# Altium PCB PCB1.PcbDoc (part 3 of 4)
Units mm, origin at the board's own origin, x right, y up, seen from the top; angles counter-clockwise.
Board outline 200 x 135 mm, 2 copper layers (Top Layer, Bottom Layer); 350 components, 150 nets, 843 pads, 251 vias.
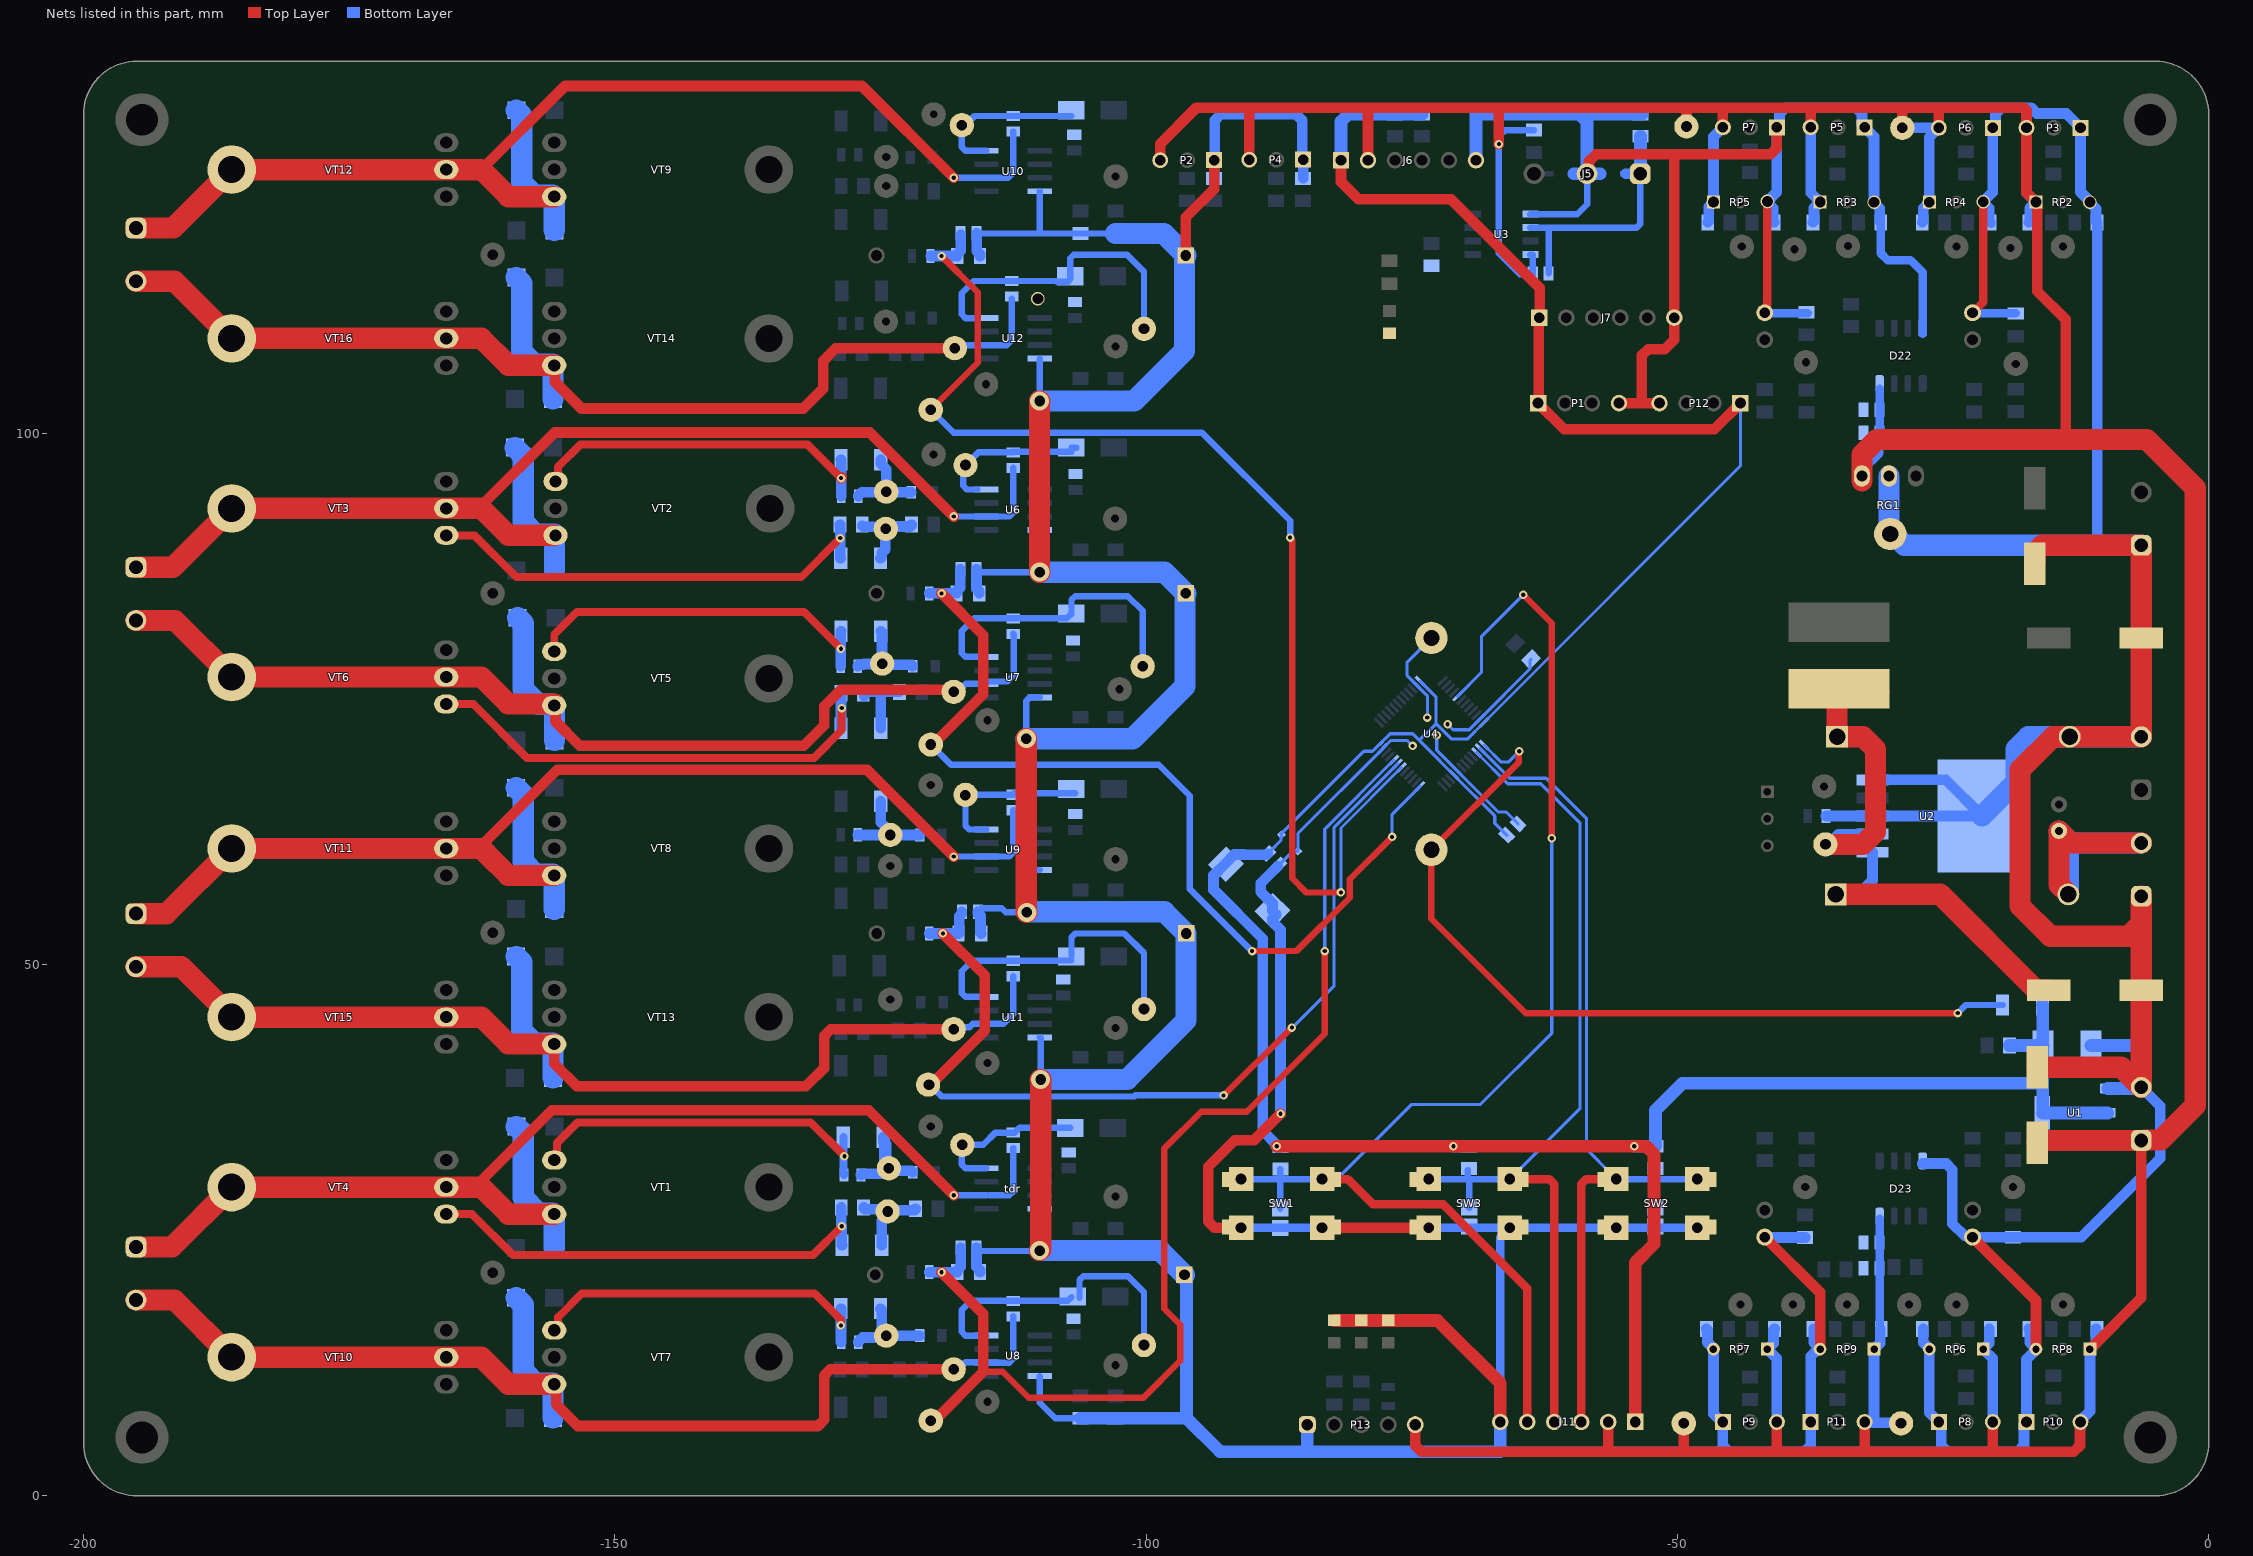
[diagram p2: the nets of this part, all layers, seen from the top]

## Via types
v1: diameter 1.27, hole 1, Top Layer to Bottom Layer, 123 vias
v2: diameter 0.8, hole 0.4, Top Layer to Bottom Layer, tented both sides, 118 vias
v3: diameter 1.8, hole 1, Top Layer to Bottom Layer, tented both sides, 6 vias
v4: diameter 1.27, hole 0.711, Top Layer to Bottom Layer, 3 vias
v5: diameter 0.8, hole 0.4, Top Layer to Bottom Layer, 1 vias

## Nets (pads, with @x,y where several pads share a name; then routed paths per layer and width w, separated by ;. In a path a pad name is that pad's centre, name@x,y a point inside that pad or via, vN(x,y) a via of type N, cw(c..) or ccw(c..) an arc to the next point about the centre after c; other vN are vias at no path point) (continued)
NetD8_1: (continued)
  Bottom Layer w1: R19.1@-127.127,78.065 -127.031,78.161 -127.031,78.196 -126.627,78.196 -126.541,78.281 -124.879,78.281 v1(-124.841,78.319) -124.855,78.333 -124.855,81.254 D8.1@-124.968,81.367 ; TP36.1@-124.766,78.319 -124.651,78.204 -122.043,78.204 -122.004,78.165 -122.004,78.115 R21.2@-121.954,78.065
NetD8_2: D8.2 R19.2 VT5.G | length 34.2
  Top Layer w0.75: VT5.G@-155.702,79.462 -155.702,81.058 -153.571,83.189 -132.197,83.189 v2(-128.724,79.716)
  Bottom Layer w1: R19.2@-128.731,78.065 -128.724,78.071 v2(-128.724,79.716) -128.724,81.361 D8.2@-128.718,81.367
NetD9_1: D9.1 R26.1 R27.2 | length 6.9
  Bottom Layer w0.5: R27.2@-126.619,75.525 R27.2@-126.492,75.652
  Bottom Layer w1: R27.2@-126.516,75.271 R27.2@-126.516,75.652 ; R27.2@-126.492,75.652 -124.968,75.652 R26.1@-123.225,75.652 ; D9.1@-124.968,72.223 -124.968,75.271
NetD9_2: D9.2 R27.1 VT6.G | length 45.8
  Top Layer w0.75: VT6.G@-165.862,74.509 -163.322,74.509 -158.256,69.443 -131.263,69.443 -128.651,72.055 v2(-128.651,74.128)
  Bottom Layer w1: R27.1@-128.721,75.525 -128.719,75.524 -128.719,72.224 D9.2@-128.718,72.223
NetD13_1: D13.1 R31.1 R34.2 TP35.1 | length 8.8
  Bottom Layer w1: R31.1@-127.087,14.438 -127.087,14.473 -126.665,14.895 -124.638,14.895 v1(-124.46,15.073) ; D13.1@-124.998,17.613 -124.873,17.488 -124.873,15.834 -124.46,15.421 v1(-124.46,15.073) ; R34.2@-121.319,15.073 v1(-124.46,15.073)
NetD13_2: D13.2 R31.2 VT7.G | length 33.7
  Top Layer w0.75: VT7.G@-155.702,15.581 -155.33,15.953 -155.33,16.811 -153.107,19.033 -131.192,19.033 -128.729,16.57 -128.729,16.035 v2(-128.72,16.026)
  Bottom Layer w1: D13.2@-128.748,17.613 -128.72,17.584 v2(-128.72,16.026) -128.72,14.467 R31.2@-128.691,14.438
NetD14_1: D14.1 R41.1 R43.2 TP49.1 | length 9.4
  Bottom Layer w1: R41.1@-127.127,62.19 v1(-124.079,62.19) ; D14.1@-124.968,65.365 -124.968,63.37 -124.079,62.481 v1(-124.079,62.19) ; R43.2@-121.319,62.19 v1(-124.079,62.19)